# Altium PCB FlightController.PcbDoc
Units mm, origin at the board's own origin, x right, y up, seen from the top; angles counter-clockwise.
Board outline 299.72 x 199.9 mm, 2 copper layers (Top Layer, Bottom Layer); 45 components, 38 nets, 179 pads, 32 vias.
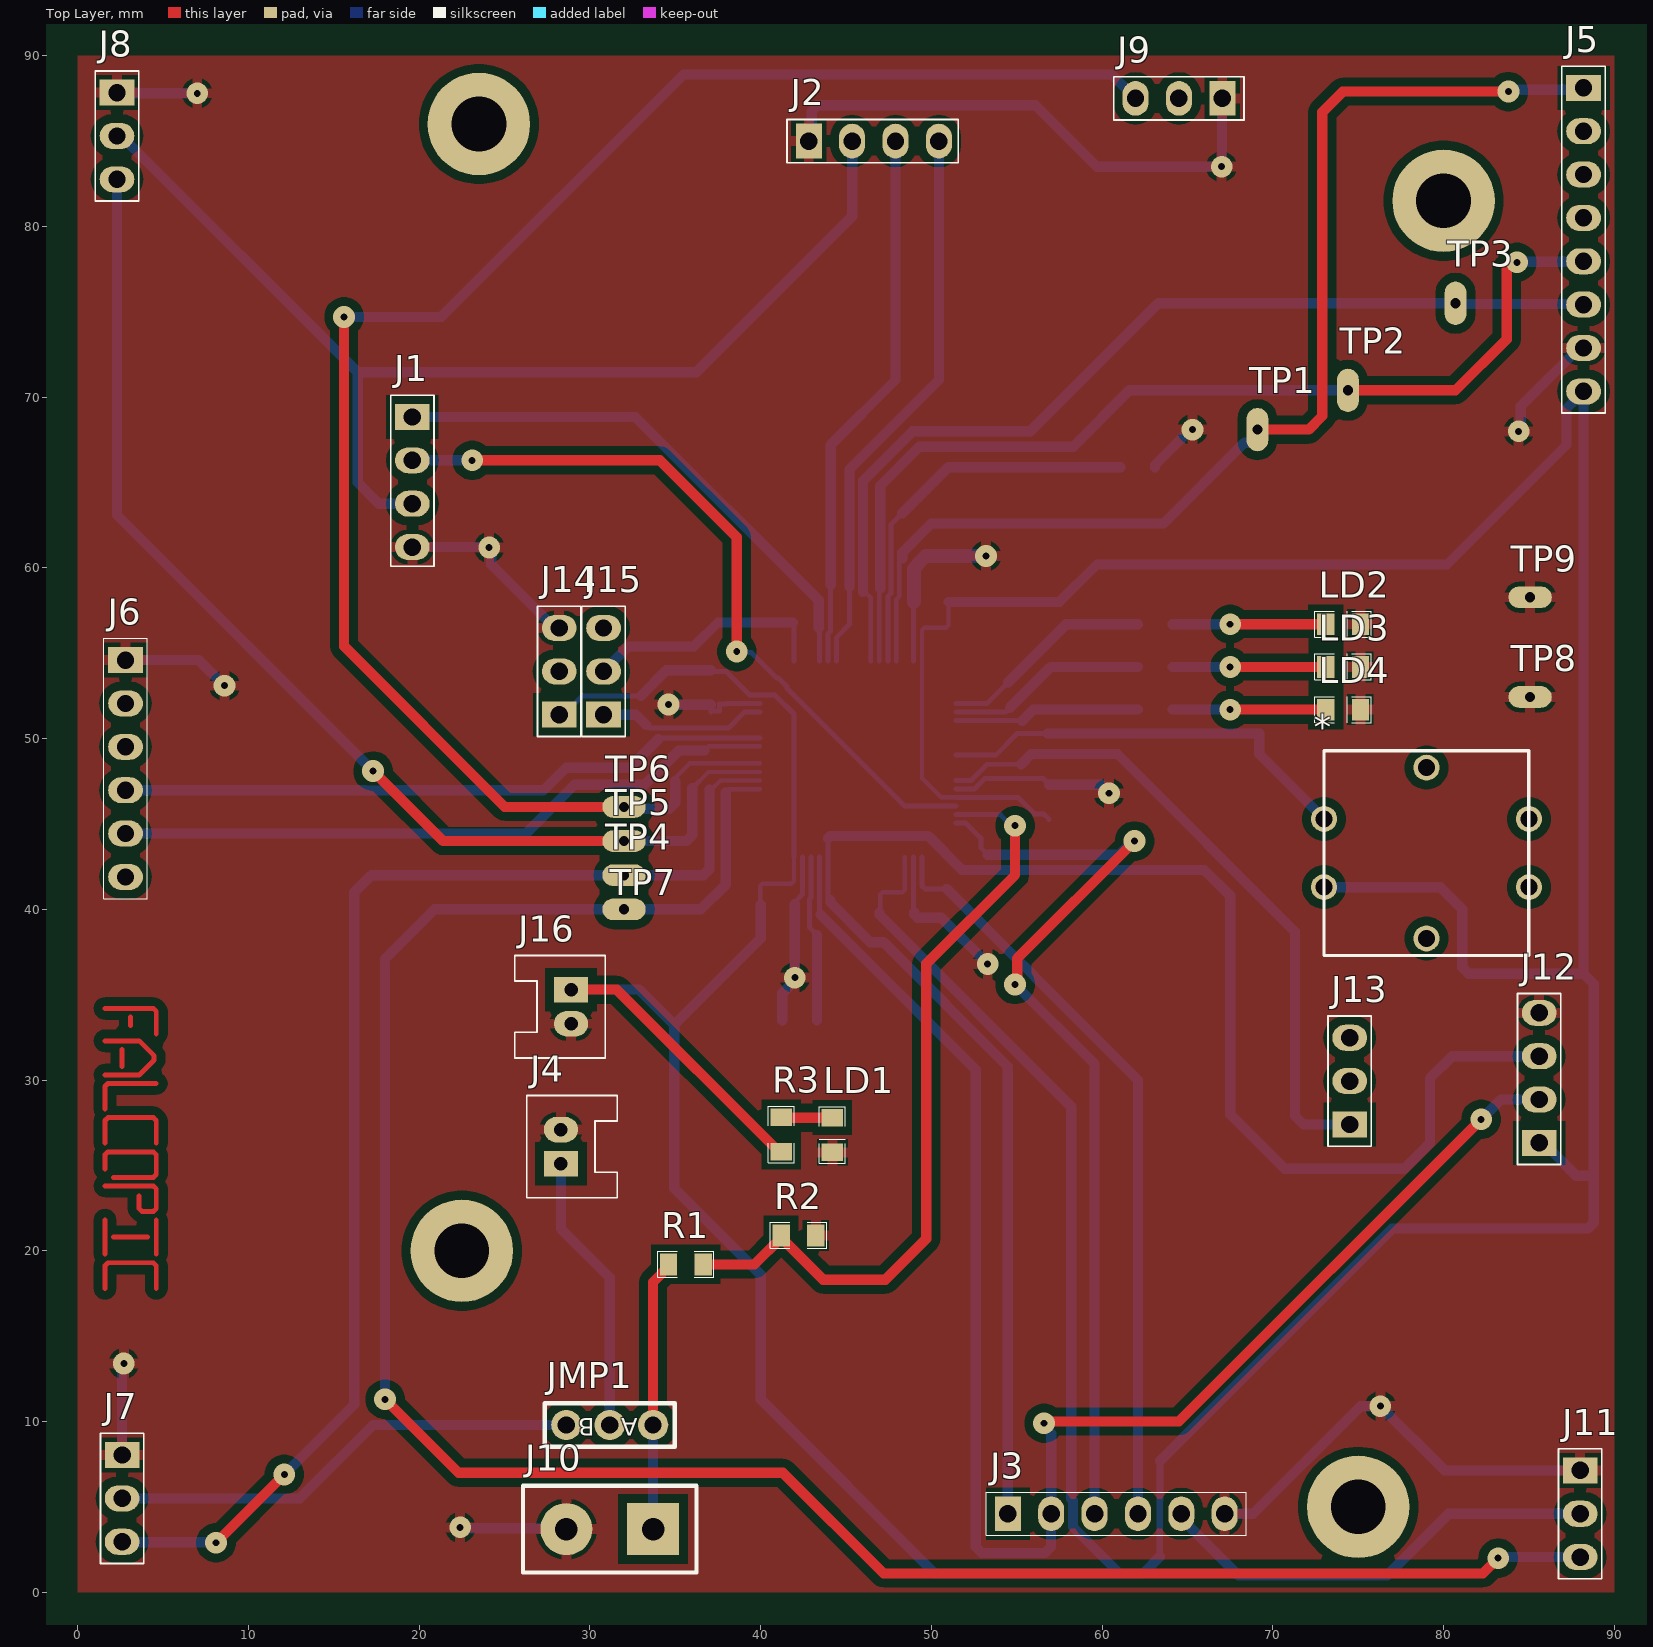
[diagram p0: Top Layer view]
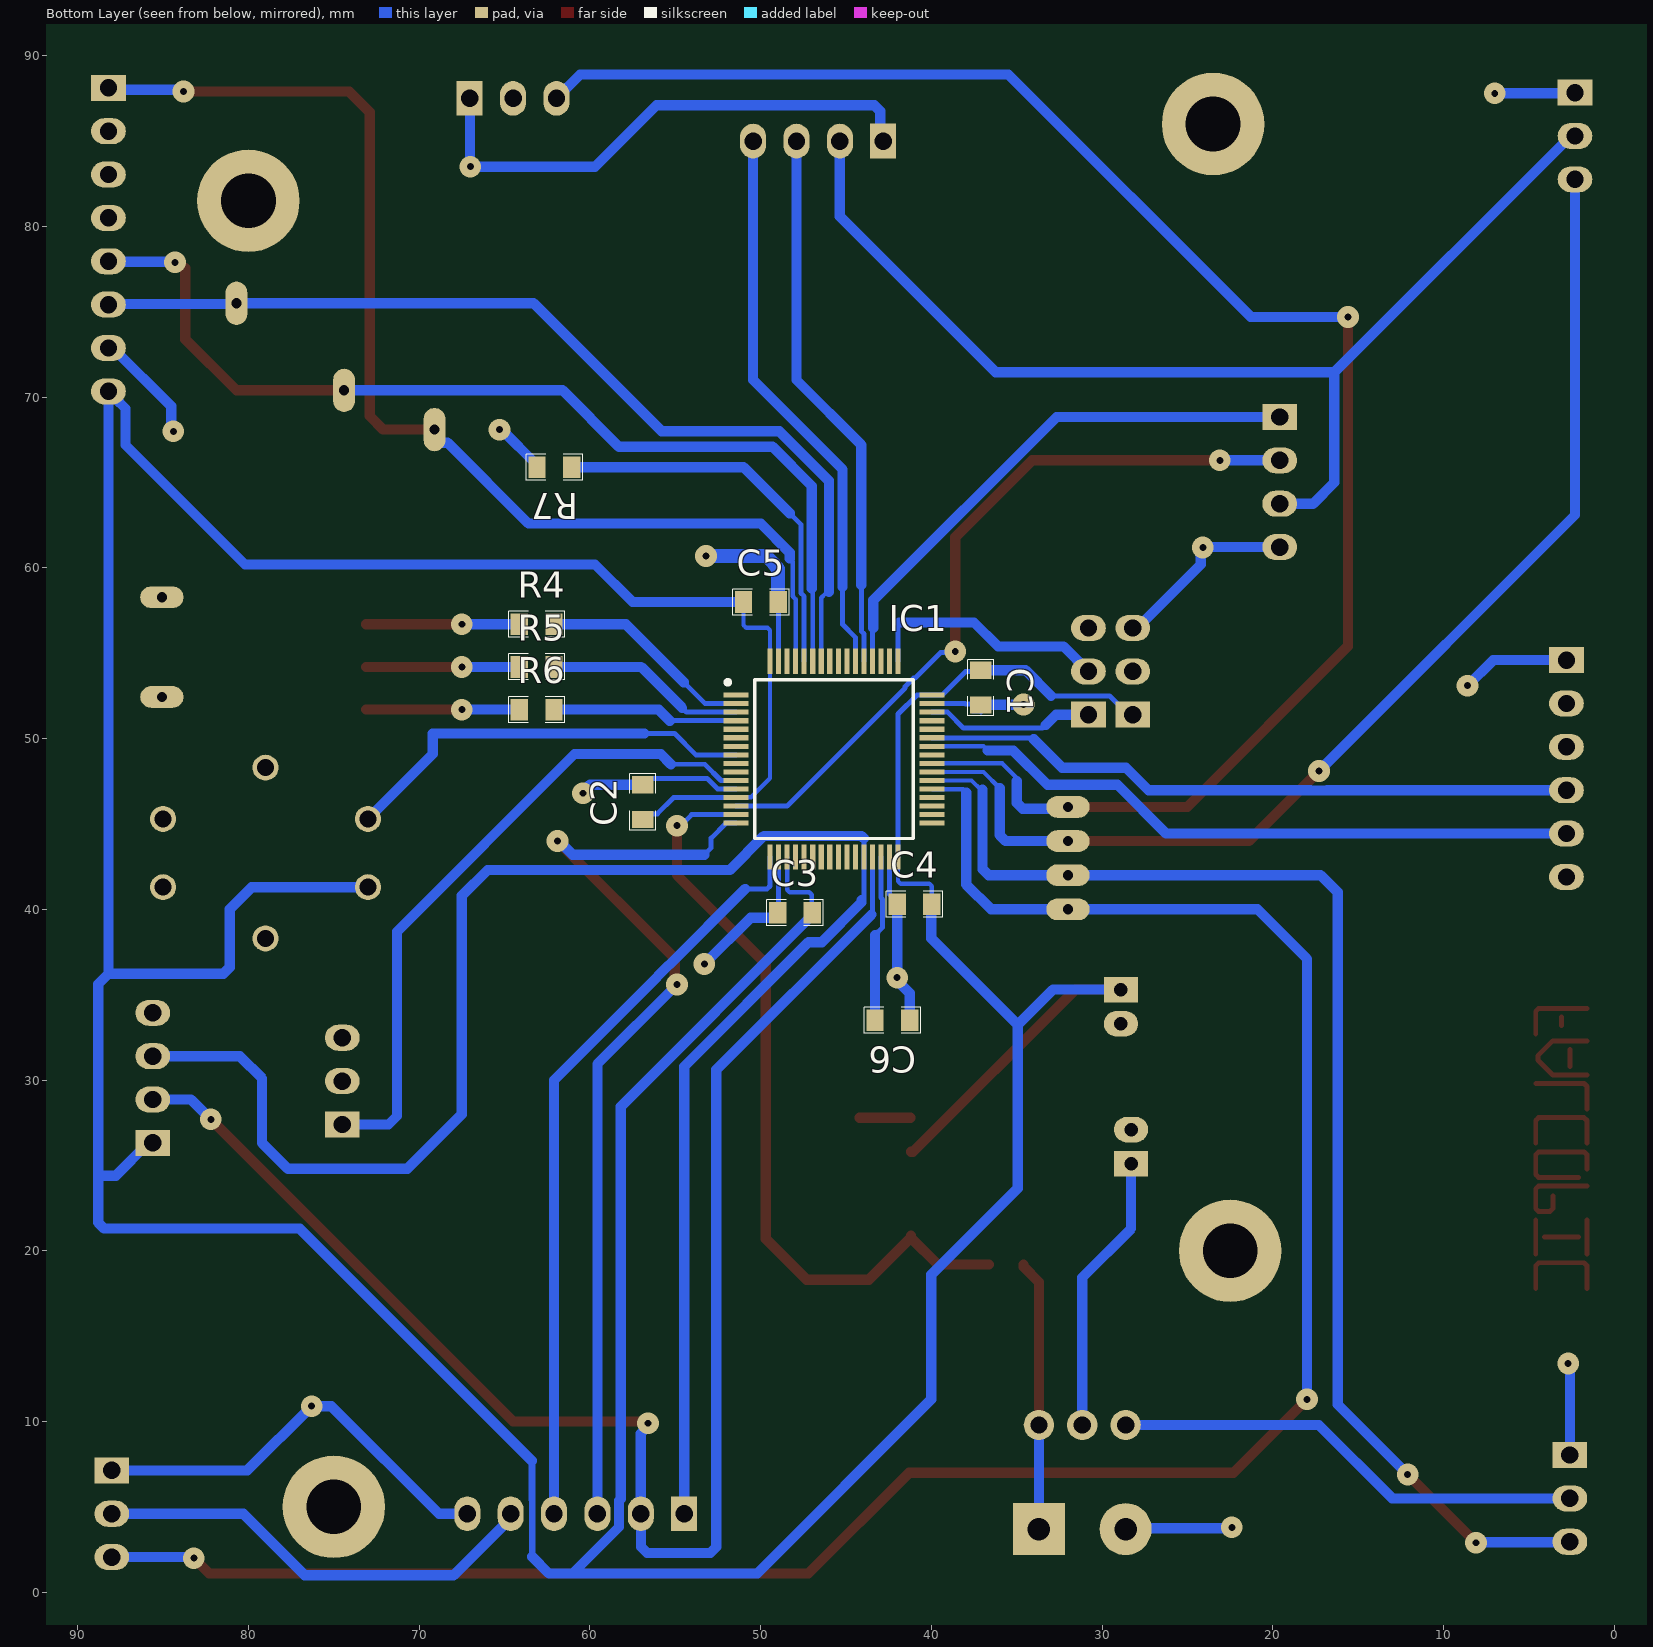
[diagram p1: Bottom Layer view, seen from below]

## Layer stack, top to bottom
Top Solder: solder mask 0.0102, Solder Resist, Dk 3.5
Top Layer: signal copper 0.0356
Dielectric1: dielectric 0.32, FR-4, Dk 4.8
Bottom Layer: signal copper 0.0356
Bottom Solder: solder mask 0.0102, Solder Resist, Dk 3.5

## Board outline
-141.655,-46.39 158.065,-46.39 158.065,153.508 -141.655,153.508

## Design rules (kind name [scope] priority, off if disabled: settings)
Clearance Clearance_bottom_polygon [OnLayer('Bottom Layer') Or OnLayer('Multi-Layer') vs OnLayer('Bottom Layer')  And  InPoly] p1: gap=0.508 ignorepadtopadclearanceinfootprint=FALSE except(0: Arc-Hole Track-Hole SMDPad-Hole THPad-Hole Via-Hole Fill-Hole Poly-Hole Region-Hole Text-Hole)
Clearance Clearance_bottom_polygon_keepout [OnLayer('Bottom Layer') Or OnLayer('Multi-Layer') Or InPoly vs OnLayer('Keepout')] p2: gap=0 ignorepadtopadclearanceinfootprint=FALSE
Clearance Clearance_top_polygon [OnLayer('Top Layer')  Or OnLayer('Multi-Layer') vs OnLayer('Top Layer') And InPoly] p3: gap=0.508 ignorepadtopadclearanceinfootprint=FALSE except(0: Arc-Hole Track-Hole SMDPad-Hole THPad-Hole Via-Hole Fill-Hole Poly-Hole Region-Hole Text-Hole)
Clearance Clearance_bottom [OnLayer('Bottom Layer') Or OnLayer('Multi-Layer') vs OnLayer('Bottom Layer')  And Not InPoly] p4: gap=0.203 ignorepadtopadclearanceinfootprint=TRUE except(0: Arc-Hole Track-Hole SMDPad-Hole THPad-Hole Via-Hole Fill-Hole Poly-Hole Region-Hole Text-Hole)
Clearance Clearance_top [OnLayer('Top Layer')  Or OnLayer('Multi-Layer') vs OnLayer('Top Layer') And Not InPoly] p5: gap=0.203 ignorepadtopadclearanceinfootprint=TRUE except(0: Arc-Hole Track-Hole SMDPad-Hole THPad-Hole Via-Hole Fill-Hole Poly-Hole Region-Hole Text-Hole)
Clearance Clearance_pad_to_pad [OnLayer('Multi-Layer') vs OnLayer('Multi-Layer')] p6: gap=0.2 ignorepadtopadclearanceinfootprint=TRUE except(0: Arc-Hole Track-Hole SMDPad-Hole THPad-Hole Via-Hole Fill-Hole Poly-Hole Region-Hole Text-Hole; 0.254: Arc-Via Arc-Text Track-Via Track-Text SMDPad-Via SMDPad-Text THPad-Via THPad-Text Via-Via Via-Text Fill-Text Poly-Text Region-Text Text-Text)
ComponentClearance ComponentClearance_bottom [OnLayer('Bottom Overlay') vs OnLayer('Bottom Overlay')] p1: gap=0 collisioncheckmode=3 verticalgap=0.254 showdistances=FALSE
ComponentClearance ComponentClearance_top [OnLayer('Top Overlay') vs OnLayer('Top Overlay')] p2: gap=0 collisioncheckmode=3 verticalgap=0.254 showdistances=FALSE
FabricationTestPointUsage TestPointUsage [All] p1: valid=0 allowmultiple=FALSE
FabricationTestpoint Testpoint [All] p1: side=3 testpointundercomponent=TRUE minsize=1.016 maxsize=2.54 preferedsize=1.524 minholesize=0 maxholesize=1.016 preferedholesize=0.813 testpointgrid=0.025 allowsidetop=TRUE allowsidebottom=TRUE usegrid=TRUE gridtolerance=0
HoleSize [All] p1: absolutevalues=TRUE maxlimit=25.4 minlimit=0.406 maxpercent=80.000 minpercent=20.000
MinimumAnnularRing [PadXSize_AllLayers = PadYSize_AllLayers] p1: minimumring=0.254
PermittedLayers [All] p1: toplayerpermitted=TRUE bottomlayerpermitted=TRUE
PolygonConnect [All] p1: connectstyle=Relief reliefconductorwidth=0.61 reliefentries=4 polygonreliefangle="90 Angle" airgapwidth=0.254
RoutingVias [All] p1: holewidth=0.406 width=1.27 viastyle="Through Hole" minholewidth=0.406 minwidth=0.914 maxholewidth=25.4 maxwidth=25.4
SMDToPlane [All] p1: distance=0
SolderMaskExpansion [All] p1: expansion=0.102 istentingtop=FALSE
SupplyNets "Schematic Supply Nets" [InNet('GND')] p1: voltage=0.000
ViasUnderSMD [All] p1: allowed=FALSE
Width Width_botom_top [OnLayer('Bottom Layer') or OnLayer('Top Layer')] p1: maxlimit=254 minlimit=0.254 preferedwidth=0.813
26 further rules are at their usual default settings.

## Components (designator, comment, footprint, x,y, rotation, side; value= is the part's Value field where it differs from the comment)
* "Bouton" PCB_bouton_v2 79,43.3 r180 top
C1 "CAP" 0805 37.1,54 r270 bottom value=100n
C2 "CAP" 0805 56.9,45.268 r90 bottom value=100n
C3 "CAP" 0805 46.968,39.8 r0 bottom value=100n
C4 "CAP" 0805 39.968,40.3 r0 bottom value=100n
C5 "CAP" 0805 51,58 r180 bottom value=100n
C6 "CAP" 0805 41.268,33.5 r0 bottom value=4.7µ
IC1 "STM32F722RET6" QFP50P1200X1200X160-64N 45.7,48.8 r180 bottom
J1 "Recept manette" HEADER4-100-1x4 19.6,68.84 r0 top
J2 "Lidar" HEADER4-100-1x4 42.82,85 r90 top
J3 "GPS + Boussole" HEADER6-100-V 54.48,4.6 r270 top
J4 "Regulateur_1" JST-B02B-PASK 28.3,25.1 r90 top
J5 "Gyro" HEADER8-100-1x8 88.2,88.12 r0 top
J6 "cable USB UART" HEADER6-100-V 2.8,54.6 r180 top
J7 "ESC1" HEADER3-100-1x3 2.6,8.04 r0 top
J8 "ESC2" HEADER3-100-1x3 2.3,87.84 r0 top
J9 "ESC3" HEADER3-100-1x3 67.04,87.5 r270 top
J10 "arrivée batterie 11.1V" POWER2 33.7,3.7 r180 top
J11 "ESC4" HEADER3-100-1x3 88,7.14 r0 top
J12 "Baro_1" HEADER4-100-1x4 85.6,26.32 r180 top
J13 "Baro_2" HEADER3-100-1x3 74.5,27.4 r180 top
J14 "Segger_1" HEADER3-100-1x3 28.2,51.4 r180 top
J15 "Segger_2" HEADER3-100-1x3 30.8,51.4 r180 top
J16 "Regulateur_2" JST-B02B-PASK 28.9,35.3 r270 top
JMP1 "JUMPER3" JMP3-100 33.7,9.8 r180 top
LD1 "comment" LED0805 44.2,25.768 r90 top
LD2 "comment" LED0805 75.132,56.7 r180 top
LD3 "comment" LED0805 75.132,54.2 r180 top
LD4 "comment" LED0805 75.132,51.7 r180 top
R1 "RES" 0805 34.6,19.2 r0 top value=3.9k
R2 "RES" 0805 41.2,20.9 r0 top value=1.2K
R3 "RES" 0805 41.2,25.8 r90 top value=2.2K
R4 "RES" 0805 62.1,56.7 r0 bottom value=2.2K
R5 "RES" 0805 62.1,54.2 r0 bottom value=2.2K
R6 "RES" 0805 62.1,51.7 r0 bottom value=2.2K
R7 "RES" 0805 61.068,65.9 r0 bottom value=10K
TP1 "TESTPOINT" testpoint2 69.1,68.1 r90 top
TP2 "TESTPOINT" testpoint2 74.4,70.4 r90 top
TP3 "TESTPOINT" testpoint2 80.7,75.5 r90 top
TP4 "TESTPOINT" testpoint2 32,42 r180 top
TP5 "TESTPOINT" testpoint2 32,44 r180 top
TP6 "TESTPOINT" testpoint2 32,46 r0 top
TP7 "TESTPOINT" testpoint2 32,40 r180 top
TP8 "TESTPOINT" testpoint2 85.07,52.439 r180 top
TP9 "TESTPOINT" testpoint2 85.07,58.281 r180 top

## Footprints (in the part's own frame and the unit in brackets; to place one, negate y for a bottom-side part, rotate by r counter-clockwise, add the part's x,y. Pads: shape width x height; smd on the part's side, far side on the other; paste and mask are expansions set on the pad)
0805 [mil]
  rect 40x50 smd: 1(0,0) 2(80,0)
  silkscreen extent -25,-30 105,30
HEADER3-100-1x3 [mil]
  rect 80x60 hole 40: 1(0,0)
  oval 80x60 hole 40: 2(0,-100) 3(0,-200)
  silkscreen extent -50,-250 50,50
HEADER4-100-1x4 [mil]
  rect 80x60 hole 40: 1(0,0)
  oval 80x60 hole 40: 2(0,-100) 3(0,-200) 4(0,-300)
  silkscreen extent -50,-344 50,50
HEADER6-100-V [mil]
  rect 80x60 hole 40: 1(0,0)
  oval 80x60 hole 40: 2(0,100) 3(0,200) 4(0,300) 5(0,400) 6(0,500)
  silkscreen extent -50,-50 50,550
HEADER8-100-1x8 [mil]
  rect 80x60 hole 40: 1(0,0)
  oval 80x60 hole 40: 2(0,-100) 3(0,-200) 4(0,-300) 5(0,-400) 6(0,-500) 7(0,-600) 8(0,-700)
  silkscreen extent -50,-750 50,50
JMP3-100 [mil]
  round 70 hole 40: 1(0,0) 2(200,0) 3(100,0)
  silkscreen extent -50,-50 250,50
JST-B02B-PASK [mm]
  rect 1.5x2 hole 0.8: 1(0,0)
  oval 1.5x2 hole 0.8: 2(2,0)
  silkscreen extent -2,-3.3 4,2
LED0805 [mil]
  rect 40x50 smd: A(80,0) K(0,0)
  silkscreen extent -25,-30 105,30
PCB_bouton_v2 [mm]
  round 1.524 hole 1: 1(-6,2) 2(-6,-2) 3(6,-2) 4(6,2) 5(0,5) 6(0,-5)
  silkscreen extent -6,-6 6,6
POWER2 [mil]
  rect 120x120 hole 52: 1(0,0)
  round 120 hole 52: 2(200,0)
  silkscreen extent -100,-100 300,100
QFP50P1200X1200X160-64N [mm]
  rect 1.475x0.3 smd: 1(-5.738,3.75) 2(-5.738,3.25) 3(-5.738,2.75) 4(-5.738,2.25) 5(-5.738,1.75) 6(-5.738,1.25) 7(-5.738,0.75) 8(-5.738,0.25) 9(-5.738,-0.25) 10(-5.738,-0.75) 11(-5.738,-1.25) 12(-5.738,-1.75) 13(-5.738,-2.25) 14(-5.738,-2.75) 15(-5.738,-3.25) 16(-5.738,-3.75) 33(5.738,-3.75) 34(5.738,-3.25) 35(5.738,-2.75) 36(5.738,-2.25) 37(5.738,-1.75) 38(5.738,-1.25) 39(5.738,-0.75) 40(5.738,-0.25) 41(5.738,0.25) 42(5.738,0.75) 43(5.738,1.25) 44(5.738,1.75) 45(5.738,2.25) 46(5.738,2.75) 47(5.738,3.25) 48(5.738,3.75)
  rect 0.3x1.475 smd: 17(-3.75,-5.738) 18(-3.25,-5.738) 19(-2.75,-5.738) 20(-2.25,-5.738) 21(-1.75,-5.738) 22(-1.25,-5.738) 23(-0.75,-5.738) 24(-0.25,-5.738) 25(0.25,-5.738) 26(0.75,-5.738) 27(1.25,-5.738) 28(1.75,-5.738) 29(2.25,-5.738) 30(2.75,-5.738) 31(3.25,-5.738) 32(3.75,-5.738) 49(3.75,5.738) 50(3.25,5.738) 51(2.75,5.738) 52(2.25,5.738) 53(1.75,5.738) 54(1.25,5.738) 55(0.75,5.738) 56(0.25,5.738) 57(-0.25,5.738) 58(-0.75,5.738) 59(-1.25,5.738) 60(-1.75,5.738) 61(-2.25,5.738) 62(-2.75,5.738) 63(-3.25,5.738) 64(-3.75,5.738)
  silkscreen extent -6.35,-4.65 4.65,4.65, body extent -6,-6 6,6, height 1.6
testpoint2 [mm]
  oval 2.54x1.27 hole 0.6: 1(0,0)

## Part data
C1 C2 C3 C4 C5 C6: "capacité non polarisée"
IC1: "Integrated Circuit", Manufacturer_Name=STMicroelectronics, Mouser Part Number=511-STM32F722RET6, Arrow Part Number=STM32F722RET6, Arrow Price/Stock=https://www.arrow.com/en/products/stm32f722ret6/stmicroelectronics?utm_currency=USD&region=nac, Datasheet Link=https://www.st.com/resource/en/datasheet/stm32f722ic.pdf, Height=1.6mm, Manufacturer_Part_Number=STM32F722RET6, Mouser Price/Stock=https://www.mouser.co.uk/ProductDetail/STMicroelectronics/STM32F722RET6?qs=NoqMqJKvPFLRYC3WLxVXLQ%3D%3D
J1 J2 J12: library part HEADER4
J3 J6: library part HEADER6
J4 J16: library part HEADER2
J5: library part HEADER8
J7 J8 J9 J11 J13 J14 J15: library part HEADER3
J10: library part POWER2, "connecteur alim 2 pôles"
JMP1: "cavalier 2 positions"
LD1 LD2 LD3 LD4: library part LED, "LED 5mm/3mm/CMS"
R1 R2 R3 R4 R5 R6 R7: "resistance"

## Free pads (board coordinates)
  round 6 hole 3.2 unplated: 1(22.5,20) 2(75,5) 3(23.5,86) 4(80,81.5)

## Via types
v1: diameter 1.27, hole 0.406, Top Layer to Bottom Layer, 32 vias

## Nets (pads, with @x,y where several pads share a name; then routed paths per layer and width w, separated by ;. In a path a pad name is that pad's centre, name@x,y a point inside that pad or via, vN(x,y) a via of type N, cw(c..) or ccw(c..) an arc to the next point about the centre after c; other vN are vias at no path point)
Bouton: *.3 IC1.8 | length 24.9
  Bottom Layer w0.29: IC1.8 53.79,49.05 55.04,50.3 56.8,50.3
  Bottom Layer w0.6: 56.8,50.3 69.2,50.3 69.2,49.1 *.3
CLk_Baro: IC1.28 J3.1 J12.3 | length 106.6
  Bottom Layer w0.29: 43.95,44.161 IC1.28 43.95,40.691 44.091,40.55
  Bottom Layer w0.6: 43.95,44.161 44.092,44.303 49.808,44.303 51.811,42.3 66,42.3 67.5,40.8 67.5,28 70.7,24.8 77.69,24.8 79.2,26.31 79.2,30.1 80.5,31.4 J12.3 ; 44.091,40.55 44.091,40.409 46.427,38.073 47.2,38.073 54.48,30.793 J3.1
ESC1: IC1.38 J7.3 TP4.1 | length 76.2
  Top Layer w0.6: v1(8.1,2.9) v1(12.1,6.9)
  Bottom Layer w0.254: 37,47 37.1,47 37.65,47.55 IC1.38
  Bottom Layer w0.6: J7.3 2.63,2.93 8.07,2.93 v1(8.1,2.9) ; v1(12.1,6.9) 16.2,11 16.2,41 17.2,42 TP4.1 36.649,42 37,42.351 37,47
ESC2: IC1.39 J8.3 TP5.1 | length 68.5
  Top Layer w0.6: v1(17.3,48.1) 21.4,44 TP5.1
  Bottom Layer w0.254: 36,47.1 36.95,48.05 IC1.39
  Bottom Layer w0.6: J8.3 2.3,63.1 v1(17.3,48.1) ; TP5.1 35.649,44 36,44.351 36,47.1
ESC3: IC1.40 J9.3 TP6.1 | length 102.4
  Top Layer w0.6: v1(15.6,74.7) 15.6,55.4 25,46 TP6.1
  Bottom Layer w0.254: 35,47.5 35,47.7 35.85,48.55 IC1.40
  Bottom Layer w0.6: v1(15.6,74.7) 21.3,74.7 35.5,88.9 60.56,88.9 J9.3 ; TP6.1 32.1,45.9 34.649,45.9 35,46.251 35,47.5
ESC4: IC1.37 J11.3 TP7.1 | length 129.7
  Top Layer w0.6: v1(18,11.3) 22.3,7 41.3,7 47.2,1.1 82.3,1.1 v1(83.2,2)
  Bottom Layer w0.254: 37.95,46.85 38.13,47.03 39.942,47.03 IC1.37
  Bottom Layer w0.6: v1(18,11.3) 18,37.1 20.9,40 TP7.1 36.5,40 37.95,41.45 37.95,46.85 ; v1(83.2,2) 83.26,2.06 J11.3
GND: C1.2 C2.2 C3.2 C4.2 C5.2 C6.1 IC1.12 IC1.18 IC1.31 IC1.47 IC1.63 J1.4 J2.1 J3.6 J4.2 J5.7 J6.1 J7.1 J8.1 J9.1 J10.2 J11.1 J12.4 J14.3 J16.2 LD1.K LD2.K LD3.K LD4.K R2.2 R7.2 TP8.1 TP9.1 | length 144.5
  Bottom Layer w0.29: C1.2@37.1,51.568 37.1,51.605 37.105,51.61 37.585,51.61 37.585,52.02 37.59,52.025 38,52.025 38.025,52.05 IC1.47 ; C4.2@42,40.427 42.45,40.877 IC1.31 ; IC1.18 48.95,39.85 C3.2 ; IC1.63 C5.2@48.95,57.982 ; IC1.12 51.44,47.052 52.517,47.052 53.128,47.663 56.537,47.663 C2.2
  Bottom Layer w0.6: J8.1 2.34,87.8 v1(7,87.8) ; J7.1 2.6,13.3 v1(2.7,13.4) v1@2.635,13.465 ; J6.1 7.1,54.6 v1(8.6,53.1) ; J1.4 23.98,61.22 24,61.2 v1(24.1,61.2) 24.228,61.072 24.228,60.198 27.946,56.48 J14.3 ; v1(22.4,3.8) 22.45,3.75 28.57,3.75 J10.2 ; v1(34.6,52) 34.616,51.984 37.084,51.984 C1.2 ; C6.1 41.268,35.087 42,35.819 v1(42,36) C4.2 ; J2.1 43,85.18 43,86.749 43.351,87.1 56.1,87.1 59.7,83.5 v1(67,83.5) 67.02,83.52 67.02,87.48 J9.1 ; C3.2 49,39.719 49.208,39.511 50.589,39.511 v1(53.3,36.8) ; C2.2 60,47.3 60.4,46.9 v1(60.4,46.8) ; R7.2 63.1,66.027 65.173,68.1 v1(65.3,68.1) ; J3.6 68.842,4.6 75.142,10.9 v1(76.3,10.9) 80.06,7.14 J11.1 ; v1(84.4,68) 84.528,68.128 84.528,69.462 87.946,72.88 J5.7 ; TP8.1 TP8.1@85.135,52.374
  Bottom Layer w0.8: C5.2 48.984,58.016 48.984,59.96 49.2,60.176 49.2,60.231 49.668,60.7 v1(53.2,60.7)
INT_Baro: IC1.11 J13.1 | length 39
  Bottom Layer w0.29: IC1.11 51.44,47.552 52.32,47.552 53.268,48.5 55.255,48.5
  Bottom Layer w0.6: 55.255,48.5 55.855,49.1 60.9,49.1 71.3,38.7 71.3,27.9 71.8,27.4 J13.1
INT_gyro: IC1.61 J5.1 TP1.1 | length 68.4
  Top Layer w0.6: TP1.1 72.1,68.1 72.9,68.9 72.9,86.7 74.1,87.9 v1(83.8,87.9)
  Bottom Layer w0.254: IC1.61 47.95,58.161 48.123,58.335 48.123,60.377 48.296,60.55
  Bottom Layer w0.6: 48.296,60.55 48.296,60.896 50,62.6 63.6,62.6 68.337,67.337 68.79,67.337 69.1,67.646 TP1.1 ; v1(83.8,87.9) 83.91,88.01 88.09,88.01 J5.1
LED_1: IC1.2 R4.1 | length 12.6
  Bottom Layer w0.29: IC1.2 53.25,52.05 54.5,53.3
  Bottom Layer w0.6: 54.5,53.3 57.9,56.7 R4.1
LED_2: IC1.3 R5.1 | length 11.8
  Bottom Layer w0.29: IC1.3 51.44,51.552 54.352,51.552 54.6,51.8
  Bottom Layer w0.6: 54.6,51.8 57,54.2 R5.1
LED_3: IC1.4 R6.1 | length 10.9
  Bottom Layer w0.29: IC1.4 55.321,51.05
  Bottom Layer w0.6: 55.321,51.05 55.971,51.7 R6.1
NetC6_2: C6.2 IC1.30 | length 9.8
  Bottom Layer w0.29: IC1.30 42.95,40.68 42.856,40.586 42.856,38.944 43.3,38.5
  Bottom Layer w0.6: C6.2 43.3,38.5
NetIC1_60: IC1.60 R7.1 | length 22.9
  Bottom Layer w0.29: IC1.60 47.45,58.333 47.648,58.532 47.648,62.548 48.3,63.2
  Bottom Layer w0.6: 48.3,63.2 51,65.9 R7.1
NetJ4_1: J4.1 JMP1.3 | length 16.5
  Bottom Layer w0.6: J4.1 28.3,21.3 31.16,18.44 JMP1.3
NetJ10_1: J10.1 JMP1.1 R1.1 | length 15.9
  Top Layer w0.6: JMP1.1 33.7,18.173 34.6,19.073 R1.1
  Bottom Layer w0.6: J10.1 JMP1.1
NetLD1_A: LD1.A R3.2 | length 3
  Top Layer w0.254: R3.2 R3.2@41.232,27.8
  Top Layer w0.6: R3.2@41.232,27.8 LD1.A
NetLD2_A: LD2.A R4.2 | length 9
  Top Layer w0.6: v1(67.5,56.7) LD2.A
  Bottom Layer w0.6: R4.2 v1(67.5,56.7)
NetLD3_A: LD3.A R5.2 | length 9
  Top Layer w0.6: v1(67.5,54.2) LD3.A
  Bottom Layer w0.6: R5.2 v1(67.5,54.2)
NetLD4_A: LD4.A R6.2 | length 9
  Top Layer w0.6: v1(67.5,51.7) LD4.A
  Bottom Layer w0.6: R6.2 v1(67.5,51.7)
Rx_GPS: IC1.17 J3.4 | length 44.5
  Bottom Layer w0.29: IC1.17 49.45,41.37 49.62,41.2 50.9,41.2
  Bottom Layer w0.6: 50.9,41.2 55.362,36.738 55.371,36.738 56.038,36.071 56.038,36.062 62.1,30 J3.4
Rx_Lidar: IC1.54 J2.4 | length 32.9
  Bottom Layer w0.29: IC1.54 44.45,55.936 45.2,56.686 45.2,58.9
  Bottom Layer w0.6: 45.2,58.9 45.2,65.766 50.44,71.006 J2.4
Rx_Manette: IC1.52 J1.1 | length 31.8
  Bottom Layer w0.29: 43.4,56.5 43.45,56.45 IC1.52
  Bottom Layer w0.6: J1.1 32.66,68.84 43.4,58.1 43.4,56.5
Rx_UART: IC1.43 J6.4 | length 38.4
  Bottom Layer w0.29: 34,49.969 34.081,50.05 IC1.43
  Bottom Layer w0.6: J6.4 16.81,46.98 16.829,46.962 17.771,46.962 17.79,46.98 27.28,46.98 28.6,48.3 32.331,48.3 34,49.969
SCL_gyro: IC1.58 J5.6 TP3.1 | length 57.3
  Bottom Layer w0.254: 46,58.6 46.1,58.5 46.2,58.5 46.45,58.25 IC1.58
  Bottom Layer w0.6: 46,58.6 46.003,58.603 46.003,65.103 48.9,68 55.8,68 63.3,75.5 TP3.1 80.74,75.46 88.16,75.46 J5.6
SDA_Baro: IC1.29 J3.2 J12.2 | length 93.2
  Top Layer w0.6: v1(56.6,9.9) 56.7,10 64.5,10 v1(82.2,27.7)
  Bottom Layer w0.29: IC1.29 43.45,40.825 43.443,40.818 43.443,39.761 43.504,39.7
  Bottom Layer w0.6: 43.504,39.7 43.504,39.696 52.6,30.6 52.6,2.651 52.951,2.3 56.649,2.3 57,2.651 57,4.58 J3.2 57.02,9.299 56.6,9.719 v1(56.6,9.9) ; v1(82.2,27.7) 83.36,28.86 J12.2
SDA_gyro: IC1.59 J5.5 TP2.1 | length 59.4
  Top Layer w0.6: TP2.1 80.7,70.4 83.7,73.4 83.7,77.549 83.767,77.549 84.119,77.9 v1(84.3,77.9)
  Bottom Layer w0.254: IC1.59 46.95,58.75 47,58.8
  Bottom Layer w0.6: 47,58.8 47,64.8 49.3,67.1 58.3,67.1 61.6,70.4 TP2.1 ; v1(84.3,77.9) 84.33,77.93 88.17,77.93 J5.5
SWCLK: IC1.49 J15.2 | length 14.6
  Bottom Layer w0.29: 41.9,56.8 41.95,56.75 IC1.49
  Bottom Layer w0.6: J15.2 32.26,55.4 36.1,55.4 37.5,56.8 41.9,56.8
SWDIO: IC1.46 J15.1 | length 9.9
  Bottom Layer w0.29: 33.3,50.8 33.483,50.617 38.114,50.617 39.046,51.548 39.96,51.548 IC1.46
  Bottom Layer w0.6: J15.1 32.7,51.4 33.3,50.8
Tx_GPS: IC1.16 J3.3 | length 56.1
  Top Layer w0.6: v1(54.9,35.6) 55.028,35.728 55.028,37.128 v1(61.9,44)
  Bottom Layer w0.29: IC1.16 52.026,45.05 52.9,44.175 52.9,43.6 53.3,43.2 ; v1@61.8,44 v1(61.9,44)
  Bottom Layer w0.6: 53.3,43.2 61,43.2 v1@61.8,44 ; v1(54.9,35.6) 59.56,30.94 J3.3
Tx_Lidar: IC1.53 J2.3 | length 32.1
  Bottom Layer w0.29: IC1.53 43.95,56.133 44.1,56.283 44.1,59
  Bottom Layer w0.6: 44.1,59 44.1,67.206 47.9,71.006 J2.3
Tx_Manette: IC1.14 J1.2 | length 44.2
  Top Layer w0.6: v1(23.1,66.3) 34.1,66.3 38.6,61.8 v1(38.6,55.1)
  Bottom Layer w0.29: v1(38.6,55.1) 38.667,55.033 39.467,55.033 40.959,53.541 41.048,53.541 41.541,53.049 41.541,52.959 48.45,46.05 IC1.14
  Bottom Layer w0.6: J1.2 v1(23.1,66.3)
Tx_UART: IC1.42 J6.5 | length 39.3
  Bottom Layer w0.254: 36.7,49.3 36.95,49.55 IC1.42
  Bottom Layer w0.6: J6.5 26.24,44.44 29.1,47.3 33.2,47.3 35.2,49.3 36.7,49.3
"valeur batterie": IC1.15 R1.2 R2.1 | length 46
  Top Layer w0.6: R1.2 39.627,19.2 R2.1@41.2,20.773 ; R2.1 R2.1@41.2,20.773 ; v1(54.9,44.9) 54.9,42.009 49.7,36.809 49.7,20.7 47.3,18.3 43.673,18.3 R2.1@41.2,20.773
  Bottom Layer w0.29: IC1.15 54.037,45.55 54.687,44.9 v1(54.9,44.9)
VDD3.3V: *.4 C1.1 C2.1 C3.1 C4.1 C5.1 IC1.13 IC1.19 IC1.32 IC1.48 IC1.64 J5.8 J12.1 J14.1 J16.1 R3.1 | length 335
  Top Layer w0.6: J16.1 31.573,35.3 41.073,25.8 R3.1
  Bottom Layer w0.254: C4.1@40,40.268 C4.1 39.968,41.351 40.117,41.5 41.801,41.5 41.95,41.649 IC1.32 ; C3.1 47,39.832 47,40.851 47.149,41 48.301,41 48.45,41.149 IC1.19 ; C5.1 51,56.649 50.851,56.5 49.599,56.5 49.45,56.351 IC1.64 49.45,47.684 50.564,46.57 51.418,46.57 IC1.13
  Bottom Layer w0.29: J14.1 28.454,51.4 29.564,52.51 32.99,52.51 ; C1.1 37.176,53.924 38,53.924 39.374,52.55 IC1.48 39.964,52.548 40.844,52.548 41.95,51.442 IC1.32 ; IC1.13 55.095,46.55 56.05,45.596 56.572,45.596 C2.1
  Bottom Layer w0.4: 63.375,2.075 63.375,5.378 63.4,5.403 63.4,7.7
  Bottom Layer w0.6: J16.1 32.88,35.3 34.94,33.24 ; 32.99,52.51 34.48,54 C1.1 ; C4.1@40,40.268 40,38.3 34.94,33.24 ; C3.1 46.968,39.673 58.2,28.441 58.2,5.463 58.295,5.368 58.295,3.822 61.017,1.1 ; C5.1 57.5,58 59.7,60.2 80.2,60.2 87.2,67.2 87.2,69.34 87.769,69.909 87.769,69.913 88.196,70.34 J5.8 88.2,36.226 ; 63.375,2.075 62.4,1.1 61.017,1.1 ; 63.4,7.7 77,21.3 88.449,21.3 88.8,21.651 88.8,24.4 ; *.4 79.8,41.3 81.1,40 81.1,36.6 81.474,36.226 88.2,36.226 ; J12.1 85.854,26.32 87.774,24.4 88.8,24.4 ; 34.94,33.24 34.94,23.66 40,18.6 40,11.3 50.2,1.1 61.017,1.1 ; 88.2,36.226 88.8,35.626 88.8,24.4
VDDESC: J7.2 JMP1.2 | length 27.8
  Bottom Layer w0.6: J7.2 13,5.5 17.3,9.8 JMP1.2
VDDESC2: J1.3 J2.2 J8.2 | length 67.2
  Bottom Layer w0.6: J8.2 2.554,85.3 16.4,71.454 ; J1.3 17.64,63.76 16.4,65 16.4,71.454 ; J2.2 45.36,80.588 36.226,71.454 16.4,71.454
VDDESC3: J3.5 J11.2 | length 26.5
  Bottom Layer w0.6: J3.5 64.64,4.346 67.986,1 76.7,1 80.3,4.6 J11.2
pads on no net: *.1 *.2 *.5 *.6 IC1.1 IC1.5 IC1.6 IC1.7 IC1.9 IC1.10 IC1.20 IC1.21 IC1.22 IC1.23 IC1.24 IC1.25 IC1.26 IC1.27 IC1.33 IC1.34 IC1.35 IC1.36 IC1.41 IC1.44 IC1.45 IC1.50 IC1.51 IC1.55 IC1.56 IC1.57 IC1.62 J5.2 J5.3 J5.4 J6.2 J6.3 J6.6 J9.2 J13.2 J13.3 J14.2 J15.3
copper on no net: | length 48.4
  Top Layer w0.29: 1.6,17.8 1.6,19.13 1.77,19.3 4.43,19.3 4.6,19.13 4.6,17.8 ; 1.6,19.8 1.6,21.8 ; 1.6,23.8 4.43,23.8 4.6,23.63 4.6,22.47 4.43,22.3 3.77,22.3 3.6,22.47 3.6,23.2 ; 1.6,24.8 1.6,25.63 1.77,25.8 4.43,25.8 4.6,25.63 4.6,24.47 4.43,24.3 2.1,24.3 ; 1.6,26.3 1.6,27.63 1.77,27.8 4.43,27.8 4.6,27.63 4.6,26.3 ; 1.6,28.3 1.6,29.63 1.77,29.8 4.6,29.8 ; 1.6,30.3 3.6,30.3 4.48,31.18 4.48,31.42 3.6,32.3 1.6,32.3 ; 1.6,34.2 4.43,34.2 4.6,34.03 4.6,32.7 ; 2.1,20.8 4.1,20.8 ; 2.6,30.8 2.6,31.8 ; 3.1,33.2 3.1,33.707 ; 4.6,19.8 4.6,21.8

## Polygon pours and split planes (outlines as drawn)
GND on Top Layer "NONET_L-01_P-001" (solid, pour order 0): 0,90 0,0 90,0 90,90

## Keep-outs
Keep-Out Layer:
  rectangle: -140.695,-46.21 -135.695,153.79
  rectangle: -135.695,-46.21 154.305,-41.21
  rectangle: 149.305,-41.21 154.305,153.79
  rectangle: -135.695,148.79 149.305,153.79

## Silkscreen, mask and mechanical layers (free items; w line width, h text height)
Mechanical 1:
  lines w0.254: 0,0 90,0 90,90 0,90 0,0
Mechanical 15:
  lines w0.2: 1.3,59.3 1.3,70.3 21.1,70.3 21.3,70.3 21.3,59.3 1.3,59.3
Mechanical 32:
  text "Les bandes en violet delimitent la surface utilisable...." at -127.762,168.504 h5.08
  text "Mais vous n'etes pas obliges de tout utiliser!!" at -109.982,157.937 h5.08
  text "ATTENTION:" at 165.633,139.217 h5.08
  text "Par defaut, les pistes" at 165.633,128.803 h5.08
  text "ont 32mil de largeur" at 165.506,119.202 h5.08
  text "En cas de besoin, cette largeur" at 165.786,110.007 h5.08
  text "peut etre reduite jusqu'a 10 mil" at 165.506,99.644 h5.08
  text "Par defaut, les vias" at 166.218,81.89 h5.08
  text "ont un diam. de 50 mil" at 166.065,71.73 h5.08
  text "En cas de besoin, ce diam." at 165.202,59.639 h5.08
  text "peut etre reduit jusqu'a 36 mil" at 165.811,48.717 h5.08

## Text inside footprints (layer, text, board x,y; h text height)
JMP1: Top Overlay "B" at 30.271,10.181 h1.02 r180; Top Overlay "A" at 32.811,10.181 h1.02 r180